# Altium PCB FullSheetOLD.PcbDoc (part 8 of 8)
Units mm, origin at the board's own origin, x right, y up, seen from the top; angles counter-clockwise.
Board outline 132.46 x 194.44 mm, 4 copper layers (Top Copper, L2_GND, L3_PWR_SIG, Bottom Copper), stack 1.586 mm thick; 495 components, 210 nets, 2171 pads, 1027 vias.
Unrouted connection lines stored in the file: 53.
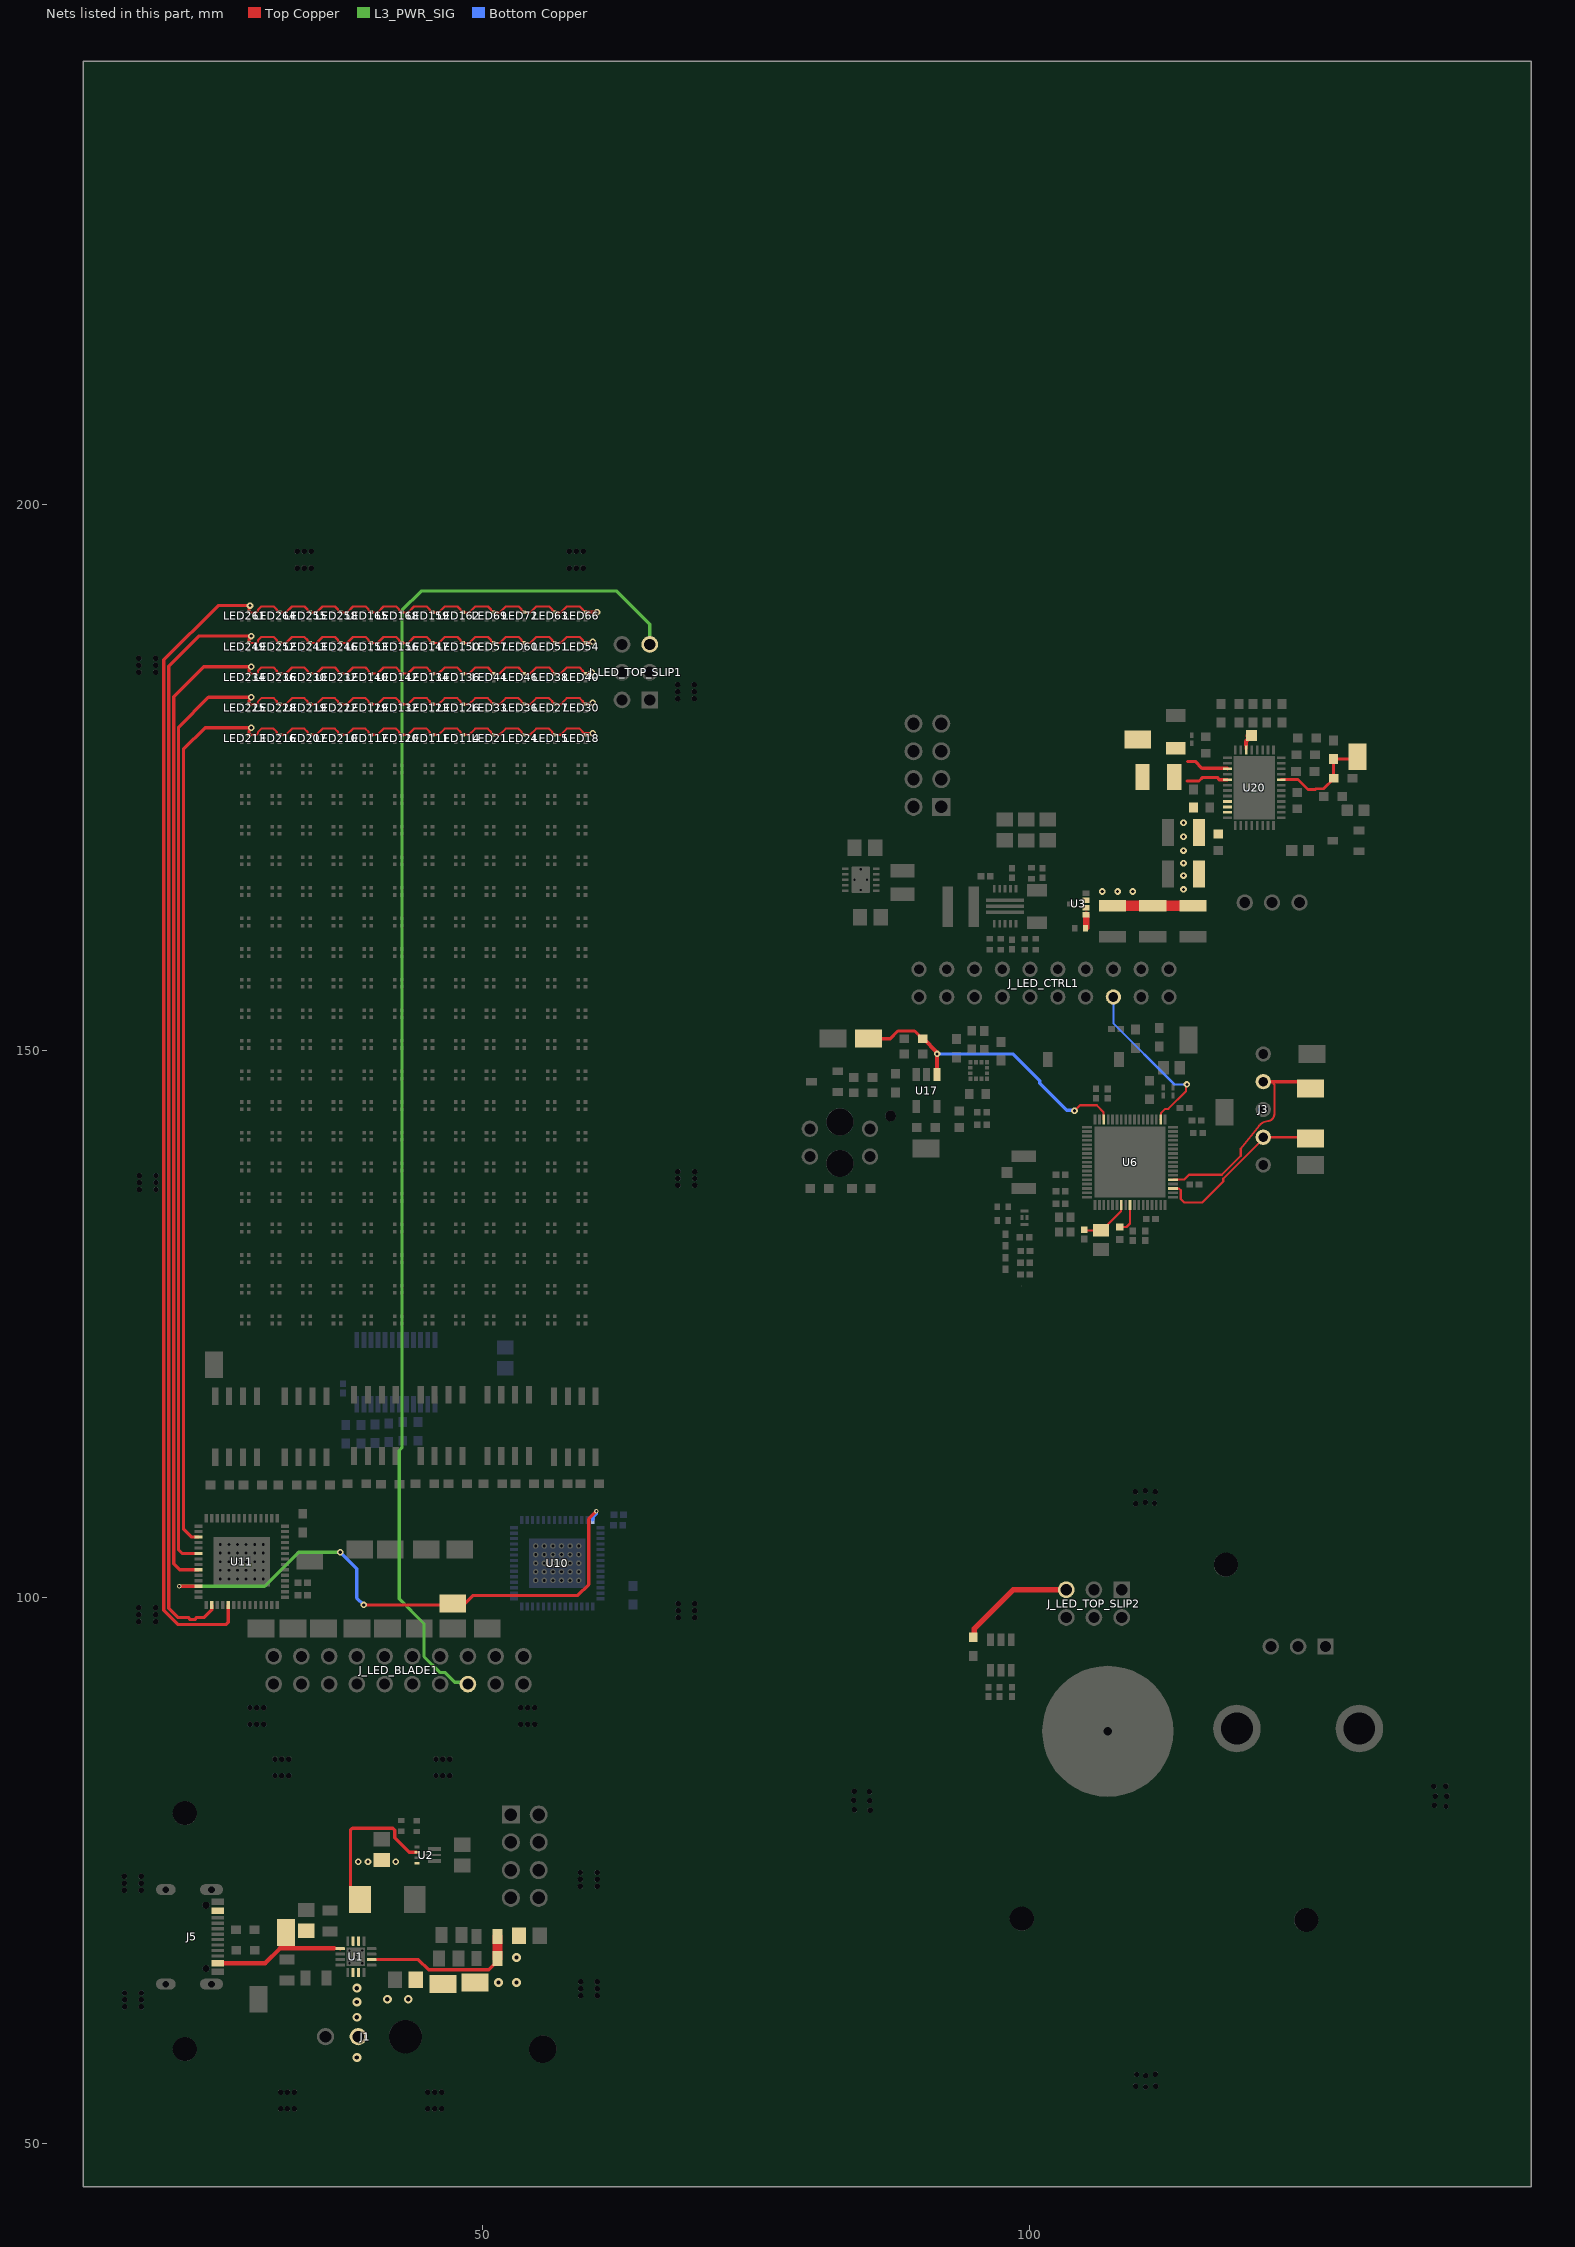
[diagram p9: the nets of this part, all layers, seen from the top]

## Via types
v1: diameter 0.6, hole 0.3, Top Copper to Bottom Copper, 857 vias
v2: diameter 0.8, hole 0.4, Top Copper to Bottom Copper, 91 vias
v3: diameter 0.4, hole 0.2, Top Copper to Bottom Copper, 79 vias

## Nets (pads, with @x,y where several pads share a name; then routed paths per layer and width w, separated by ;. In a path a pad name is that pad's centre, name@x,y a point inside that pad or via, vN(x,y) a via of type N, cw(c..) or ccw(c..) an arc to the next point about the centre after c; other vN are vias at no path point) (continued)
R19: LED15.3 LED18.3 LED21.3 LED24.3 LED111.3 LED114.3 LED117.3 LED120.3 LED207.3 LED210.3 LED213.3 LED216.3 U11.17 | length 118
  Top Copper w0.2: LED213.3@28.6,178.93 29.305,178.93 29.422,179.047 29.422,179.171 29.744,179.493 30.861,179.493 31.155,179.199 31.155,179.112 31.272,178.995 31.335,178.995 LED216.3@31.4,178.93 31.975,178.93 32.538,179.493 33.661,179.493 33.955,179.199 33.955,179.112 34.072,178.995 34.135,178.995 LED207.3@34.2,178.93 34.769,178.93 35.332,179.493 36.461,179.493 36.755,179.199 36.755,179.112 36.872,178.995 36.935,178.995 LED210.3@37,178.93 37.563,178.93 38.126,179.493 39.261,179.493 39.555,179.199 39.555,179.112 39.672,178.995 39.735,178.995 LED117.3@39.8,178.93 40.357,178.93 40.92,179.493 42.061,179.493 42.355,179.199 42.355,179.112 42.472,178.995 42.535,178.995 LED120.3@42.6,178.93 43.151,178.93 43.714,179.493 44.861,179.493 45.155,179.199 45.155,179.112 45.272,178.995 45.335,178.995 LED111.3@45.4,178.93 45.945,178.93 46.508,179.493 47.661,179.493 47.955,179.199 47.955,179.112 48.072,178.995 48.135,178.995 LED114.3@48.2,178.93 48.739,178.93 49.302,179.493 50.461,179.493 50.755,179.199 50.755,179.112 50.872,178.995 50.935,178.995 LED21.3@51,178.93 51.533,178.93 52.096,179.493 53.261,179.493 53.555,179.199 53.555,179.112 53.672,178.995 53.735,178.995 LED24.3@53.8,178.93 54.327,178.93 54.89,179.493 56.061,179.493 56.355,179.199 56.355,179.112 56.472,178.995 56.535,178.995 LED15.3@56.6,178.93 57.121,178.93 57.684,179.493 58.861,179.493 59.155,179.199 59.155,179.112 59.272,178.995 LED18.3@59.335,178.995
  Top Copper w0.3: U11.17@23.992,105.527 23.362,105.527 22.614,106.275 22.614,177.601 24.591,179.578 v1(28.829,179.578) 28.829,179.497 28.615,179.283 28.615,178.945 LED213.3@28.6,178.93 ; LED18.3@59.335,178.995 59.352,179.013 60.014,179.013 v1(60.071,179.07)
R20: LED27.3 LED30.3 LED33.3 LED36.3 LED123.3 LED126.3 LED129.3 LED132.3 LED219.3 LED222.3 LED225.3 LED228.3 U11.20 | length 122.9
  Top Copper w0.2: LED225.3@28.6,181.73 29.305,181.73 29.422,181.847 29.422,181.965 29.744,182.287 30.867,182.287 31.155,181.999 31.155,181.912 31.272,181.795 31.335,181.795 LED228.3@31.4,181.73 31.981,181.73 32.538,182.287 33.667,182.287 33.955,181.999 33.955,181.912 34.072,181.795 34.135,181.795 LED219.3@34.2,181.73 34.775,181.73 35.332,182.287 36.467,182.287 36.755,181.999 36.755,181.912 36.872,181.795 36.935,181.795 LED222.3@37,181.73 37.569,181.73 38.126,182.287 39.267,182.287 39.555,181.999 39.555,181.912 39.672,181.795 39.735,181.795 LED129.3@39.8,181.73 40.363,181.73 40.92,182.287 42.067,182.287 42.355,181.999 42.355,181.912 42.472,181.795 42.535,181.795 LED132.3@42.6,181.73 43.157,181.73 43.714,182.287 44.867,182.287 45.155,181.999 45.155,181.912 45.272,181.795 45.335,181.795 LED123.3@45.4,181.73 45.951,181.73 46.508,182.287 47.667,182.287 47.955,181.999 47.955,181.912 48.072,181.795 48.135,181.795 LED126.3@48.2,181.73 48.745,181.73 49.302,182.287 50.467,182.287 50.755,181.999 50.755,181.912 50.872,181.795 50.935,181.795 LED33.3@51,181.73 51.539,181.73 52.096,182.287 53.267,182.287 53.555,181.999 53.555,181.912 53.672,181.795 53.735,181.795 LED36.3@53.8,181.73 54.333,181.73 54.89,182.287 56.067,182.287 56.355,181.999 56.355,181.912 56.472,181.795 56.535,181.795 LED27.3@56.6,181.73 57.127,181.73 57.684,182.287 58.867,182.287 59.155,181.999 59.155,181.912 59.272,181.795 LED30.3@59.335,181.795
  Top Copper w0.3: U11.20@23.992,104.027 22.481,104.027 22.164,104.343 22.164,179.633 24.903,182.372 v1(28.829,182.372) 28.829,182.291 28.615,182.077 28.615,181.745 LED225.3@28.6,181.73 ; LED30.3@59.4,181.73 59.415,181.745 59.871,181.745 59.99,181.864 v1(60.071,181.864)
R21: LED38.3 LED40.3 LED44.3 LED46.3 LED134.3 LED136.3 LED140.3 LED142.3 LED230.3 LED232.3 LED234.3 LED236.3 U11.23 | length 127.9
  Top Copper w0.2: LED234.3@28.6,184.53 29.305,184.53 29.422,184.647 29.422,184.759 29.744,185.081 30.873,185.081 31.155,184.799 31.155,184.712 31.272,184.595 31.335,184.595 LED236.3@31.4,184.53 31.987,184.53 32.538,185.081 33.673,185.081 33.955,184.799 33.955,184.712 34.072,184.595 34.135,184.595 LED230.3@34.2,184.53 34.781,184.53 35.332,185.081 36.473,185.081 36.755,184.799 36.755,184.712 36.872,184.595 36.935,184.595 LED232.3@37,184.53 37.575,184.53 38.126,185.081 39.273,185.081 39.555,184.799 39.555,184.712 39.672,184.595 39.735,184.595 LED140.3@39.8,184.53 40.369,184.53 40.92,185.081 42.073,185.081 42.355,184.799 42.355,184.712 42.472,184.595 42.535,184.595 LED142.3@42.6,184.53 43.163,184.53 43.714,185.081 44.873,185.081 45.155,184.799 45.155,184.712 45.272,184.595 45.335,184.595 LED134.3@45.4,184.53 45.957,184.53 46.508,185.081 47.673,185.081 47.955,184.799 47.955,184.712 48.072,184.595 48.135,184.595 LED136.3@48.2,184.53 48.751,184.53 49.302,185.081 50.473,185.081 50.755,184.799 50.755,184.712 50.872,184.595 50.935,184.595 LED44.3@51,184.53 51.545,184.53 52.096,185.081 53.273,185.081 53.555,184.799 53.555,184.712 53.672,184.595 53.735,184.595 LED46.3@53.8,184.53 54.339,184.53 54.89,185.081 56.073,185.081 56.355,184.799 56.355,184.712 56.472,184.595 56.535,184.595 LED38.3@56.6,184.53 57.133,184.53 57.684,185.081 58.873,185.081 59.155,184.799 59.155,184.712 59.272,184.595 59.335,184.595 LED40.3@59.4,184.53
  Top Copper w0.3: U11.23@23.985,102.526 23.677,102.526 23.67,102.533 22.255,102.533 21.714,103.074 21.714,182.427 24.453,185.166 v1(28.829,185.166) 28.829,185.085 28.615,184.871 28.615,184.545 LED234.3@28.6,184.53 ; LED40.3@59.4,184.53 59.415,184.545 59.809,184.545 59.907,184.643 v1(59.988,184.643)
R22: LED51.3 LED54.3 LED57.3 LED60.3 LED147.3 LED150.3 LED153.3 LED156.3 LED243.3 LED246.3 LED249.3 LED252.3 U11.30 | length 137.8
  Top Copper w0.2: LED249.3@28.6,187.33 29.305,187.33 29.422,187.447 29.422,187.553 29.744,187.875 30.879,187.875 31.155,187.599 31.155,187.512 31.272,187.395 31.335,187.395 LED252.3@31.4,187.33 31.993,187.33 32.538,187.875 33.679,187.875 33.955,187.599 33.955,187.512 34.072,187.395 34.135,187.395 LED243.3@34.2,187.33 34.787,187.33 35.332,187.875 36.479,187.875 36.755,187.599 36.755,187.512 36.872,187.395 36.935,187.395 LED246.3@37,187.33 37.581,187.33 38.126,187.875 39.279,187.875 39.555,187.599 39.555,187.512 39.672,187.395 39.735,187.395 LED153.3@39.8,187.33 40.375,187.33 40.92,187.875 42.079,187.875 42.355,187.599 42.355,187.512 42.472,187.395 42.535,187.395 LED156.3@42.6,187.33 43.169,187.33 43.714,187.875 44.879,187.875 45.155,187.599 45.155,187.512 45.272,187.395 45.335,187.395 LED147.3@45.4,187.33 45.963,187.33 46.508,187.875 47.679,187.875 47.955,187.599 47.955,187.512 48.072,187.395 48.135,187.395 LED150.3@48.2,187.33 48.757,187.33 49.302,187.875 50.479,187.875 50.755,187.599 50.755,187.512 50.872,187.395 50.935,187.395 LED57.3@51,187.33 51.551,187.33 52.096,187.875 53.279,187.875 53.555,187.599 53.555,187.512 53.672,187.395 53.735,187.395 LED60.3@53.8,187.33 54.345,187.33 54.89,187.875 56.079,187.875 56.355,187.599 56.355,187.512 56.472,187.395 56.535,187.395 LED51.3@56.6,187.33 57.009,187.33 57.035,187.356 57.165,187.356 57.684,187.875 58.879,187.875 59.155,187.599 59.155,187.512 59.272,187.395 LED54.3@59.335,187.395
  Top Copper w0.3: U11.30@25.203,99.316 25.203,98.877 25.153,98.827 25.153,98.814 24.509,98.171 23.838,98.171 23.647,97.98 23.233,97.98 23.042,98.171 22.098,98.171 21.264,99.005 21.264,185.221 24.003,187.96 v1(28.829,187.96) 28.829,187.879 28.615,187.665 28.615,187.345 LED249.3@28.6,187.33 ; LED54.3@59.4,187.33 59.415,187.345 59.883,187.345 59.99,187.452 v1(60.071,187.452)
R23: LED63.3 LED66.3 LED69.3 LED72.3 LED159.3 LED162.3 LED165.3 LED168.3 LED255.3 LED258.3 LED261.3 LED264.3 U11.33 | length 143
  Top Copper w0.2: LED261.3@28.6,190.13 29.305,190.13 29.422,190.247 29.422,190.347 29.744,190.669 30.885,190.669 31.155,190.399 31.155,190.312 31.272,190.195 31.335,190.195 LED264.3@31.4,190.13 31.999,190.13 32.538,190.669 33.685,190.669 33.955,190.399 33.955,190.312 34.072,190.195 34.135,190.195 LED255.3@34.2,190.13 34.793,190.13 35.332,190.669 36.485,190.669 36.755,190.399 36.755,190.312 36.872,190.195 36.935,190.195 LED258.3@37,190.13 37.587,190.13 38.126,190.669 39.285,190.669 39.555,190.399 39.555,190.312 39.672,190.195 39.735,190.195 LED165.3@39.8,190.13 40.381,190.13 40.92,190.669 42.085,190.669 42.355,190.399 42.355,190.312 42.472,190.195 42.535,190.195 LED168.3@42.6,190.13 43.175,190.13 43.714,190.669 44.885,190.669 45.155,190.399 45.155,190.312 45.272,190.195 45.335,190.195 LED159.3@45.4,190.13 45.969,190.13 46.508,190.669 47.685,190.669 47.955,190.399 47.955,190.312 48.072,190.195 48.135,190.195 LED162.3@48.2,190.13 48.763,190.13 49.302,190.669 50.485,190.669 50.755,190.399 50.755,190.312 50.872,190.195 50.935,190.195 LED69.3@51,190.13 51.557,190.13 52.096,190.669 53.285,190.669 53.555,190.399 53.555,190.312 53.672,190.195 53.735,190.195 LED72.3@53.8,190.13 54.351,190.13 54.89,190.669 56.085,190.669 56.355,190.399 56.355,190.312 56.472,190.195 56.535,190.195 LED63.3@56.6,190.13 57.145,190.13 57.684,190.669 58.885,190.669 59.155,190.399 59.155,190.375 LED66.3@59.4,190.13
  Top Copper w0.3: U11.33@26.703,99.316 26.703,97.712 26.527,97.536 23.84,97.536 23.834,97.53 23.047,97.53 23.041,97.536 22.097,97.536 20.814,98.819 20.814,185.787 25.781,190.754 v1(28.702,190.754) 28.702,190.673 28.615,190.586 28.615,190.145 LED261.3@28.6,190.13 ; v1(60.452,190.132) v1(60.452,190.132) LED66.3@59.401,190.131 ; LED66.3@59.4,190.13 LED66.3@59.401,190.131
ROT_INDEX: R43.2 TP26.1 U6.15 U17.1 | length 28
  Top Copper w0.2: v1(104.14,144.526) 104.648,145.034 106.17,145.034 106.797,144.407 106.797,143.774 U6.15@106.82,143.751
  Top Copper w0.3: TP26.1@85.293,151.123 87.276,151.123 87.984,151.83 89.508,151.83 90.208,151.13 R43.2@90.258,151.13
  Top Copper w0.381: R43.2@90.308,151.13 91.562,149.876 U17.1@91.562,147.857
  Bottom Copper w0.3: v1(91.567,149.733) 98.494,149.733 100.96,147.267 100.96,147.042 103.419,144.583 104.083,144.583 v1(104.14,144.526)
SOUT: TP17.1 U10.42 U11.26 | length 52.8
  Top Copper w0.3: v3(22.234,101.033) 22.241,101.026 U11.26@23.992,101.026 ; v1(39.116,99.314) 48.26,99.314 49.131,100.185 58.69,100.185 59.689,101.184 59.689,107.187 v3(60.392,107.89)
  L3_PWR_SIG w0.3: v3(22.234,101.033) 30.037,101.033 33.143,104.14 v1(36.957,104.14)
  Bottom Copper w0.3: v1(36.957,104.14) 38.481,102.616 38.481,99.949 v1(39.116,99.314) ; U10.42@60.057,107.097 60.057,107.324 60.373,107.64 60.373,107.871 v3(60.392,107.89)
SOX: TP_SOX.1 U20.38 | length 1.4
  Top Copper w0.3: U20.38@119.825,177.646 119.825,177.99
  Top Copper w0.4: 119.825,177.99 119.825,178.341 119.967,178.483 TP_SOX.1@120.109,178.625
  Top Copper w0.5: TP_SOX.1@120.03,178.858 TP_SOX.1@120.315,178.858
SW_BK: L8.1 U20.5 | length 3.9
  Top Copper w0.3: 114.426,174.702 115.528,174.702 115.853,175.027 117.192,175.027 117.391,174.828 U20.5@118.145,174.828
SWAKE: R55.2 R56.2 TP_SWK.1 U20.28 | length 9.6
  Top Copper w0.254: U20.28@123.052,174.828 124.598,174.828 125.088,174.338 125.505,173.921 126.174,173.921 126.243,173.99 126.912,173.99 R56.2@127.865,174.942 127.825,174.982 R55.2@127.825,176.72 129.476,176.72 TP_SWK.1@129.857,177.101
SWCLK: J3.4 TP10.1 U6.56 | length 20
  Top Copper w0.2: U6.56@113.144,138.227 113.167,138.25 114.189,138.25 114.611,138.672 117.606,138.672 119.347,140.414 119.347,141.064 121.049,143.174 cw(c121.916,142.475) 121.834,143.586 ccw(c121.759,144.25) 122.428,144.25 122.428,146.939 122.174,147.193
  Top Copper w0.3: J3.4@121.412,147.193 122.174,147.193 124.695,147.193 125.33,146.558 TP10.1@125.73,146.558
SWDIO: J3.2 TP8.1 U6.54 | length 16.3
  Top Copper w0.2: U6.54@113.144,137.427 113.167,137.404 113.705,137.404 113.851,137.258 113.851,136.466 114.173,136.144 115.84,136.144 117.751,138.055 117.751,138.322 121.412,141.983 J3.2@121.412,142.113 125.603,142.113 TP8.1@125.73,141.986
TOP_UI.TOUCH_OUT_TOP: J_LED_BLADE1.15 J_LED_CTRL1.15 J_LED_TOP_SLIP1.05 J_LED_TOP_SLIP2.05 R53.1 U6.2 | length 155.6
  Top Copper w0.2: U6.2@112.02,143.751 112.043,143.774 112.043,144.312 112.434,144.703 112.717,144.703 114.353,146.339 114.353,146.865 v1(114.427,146.939)
  Top Copper w0.5: R53.1@94.869,96.404 94.987,96.522 94.987,97.146 98.552,100.711 J_LED_TOP_SLIP2.05@103.378,100.711
  L3_PWR_SIG w0.3: J_LED_BLADE1.15@48.641,92.075 48.467,92.249 47.429,92.249 46.541,93.137 46.077,93.137 44.623,94.591 44.623,97.595 42.353,99.865 42.353,113.447 42.607,113.701 42.607,190.308 44.381,192.082 62.254,192.082 65.278,189.058 65.278,187.706 65.786,187.198 65.577,186.989 J_LED_TOP_SLIP1.05@65.577,186.694
  Bottom Copper w0.2: J_LED_CTRL1.15@107.696,154.94 107.696,152.527 113.284,146.939 v1(114.427,146.939)
VBAT: C2.2 J1.1 TP_VBT.1 U1.2 U1.3
  other v2: 38.481,57.912 38.481,61.595 38.481,62.992 41.275,63.246 43.18,63.246 38.481,64.262
VBK: C_bk1.2 L8.2 TP_VBK.1 U20.3 | length 3.9
  Top Copper w0.3: 114.49,176.495 115.184,176.495 115.802,175.877 117.544,175.877 117.564,175.856 118.117,175.856 U20.3@118.145,175.828
VBUS: C1.2 J5.A4_B9 J5.B4_A9 TP_VBS.1 U1.13 | length 11.8
  Top Copper w0.3: 36.405,67.889 36.936,67.889 U1.13@36.956,67.869
  Top Copper w0.4: J5.B4_A9@25.756,66.549 30.1,66.549 31.44,67.889 36.405,67.889
VFBSMPS: C34.2 L5.1 U6.41 | length 4.7
  Top Copper w0.2: C34.2@105.029,133.652 105.092,133.589 106.695,133.589 107.177,134.07 107.177,134.122 108.397,135.342 108.397,135.88 U6.41@108.42,135.903
VLXSMPS: L4.2 U6.43 | length 2.8
  Top Copper w0.2: L4.2@108.27,133.901 108.903,133.901 109.22,134.218 U6.43@109.22,135.903
VMOTOR_ROT: C13.2 C14.2 C15.2 C52.2 C53.2 C54.1 C_VM_BK1.1 R10.2 U3.1 U3.2 U3.3 U20.9 U20.10 U20.11 | length 8.6
  Top Copper w0.6: R10.2@105.194,161.273 U3.1@105.194,162.474
  Top Copper w1: C13.2@107.624,163.289 111.307,163.289 C15.2@114.99,163.289
  other v1: 106.68,164.592 108.077,164.592 109.474,164.592 114.109,164.782 114.109,166.052 114.109,167.195 114.109,168.338 114.109,169.608 114.109,170.879
VSYS: C3.2 C4.2 L1.1 R1.2 R2.2 TP_VSYS.1 U1.6 U1.10 U1.11 U2.5 U2.7 | length 27.1
  Top Copper w0.3: 37.896,73.66 37.896,78.717 38.071,78.892 41.76,78.892 41.935,78.717 41.935,78.012 43.269,76.679 U2.5@43.983,76.679 ; U1.6@39.826,66.869 44.109,66.869 45.049,65.929 50.538,65.929 51.333,66.724 R2.2@51.333,66.954
  Top Copper w0.9: R2.2@51.333,66.954 R1.2@51.333,68.986
  Top Copper w1: C3.2@53.266,69.025 C3.2@53.304,69.063
  other v1: 38.608,75.819 39.497,75.819 42.037,75.819
  other v2: 51.435,64.77 53.086,64.77 53.086,67.056
pads on no net: B1.14 B1.15 B1.16 B1.17 E1. J1.3 J5. J5.A6 J5.A7 J5.A8 J5.B6 J5.B7 J5.B8 J_LED_CTRL1.20 U1.14 U1.15 U6.17 U6.18 U6.19 U6.23 U6.27 U6.36 U6.37 U6.38 U6.40 U6.46 U6.47 U6.48 U6.49 U6.51 U6.52 U6.53 U6.57 U6.61 U6.62 U6.63 U6.64 U11.2 U11.3 U11.4 U11.5 U11.6 U11.7 U11.36 U11.37 U11.38 U11.39 U11.40 U11.41 U11.44 U11.45 U11.46 U11.47 U11.48 U11.49 U11.50 U11.51 U11.52 U11.53 U11.54 U11.55 U16. U18.5 U18.11 U20.22 U20.23 U20.24 U20.25 U20.32 U20.33 U20.36 U20.37 U20.39 X3.1 X3.2
copper on no net:
  other v1: 26.47,124.936 28.702,143.256 28.705,146.068 28.705,148.862 28.705,151.656 28.705,154.45 28.956,157.226 28.956,160.02 28.956,162.814 28.956,165.608

## Polygon pours and split planes (outlines as drawn)
DVDD on Top Copper "DVDD_L01_P102" (solid, pour order 102): 116.776,177.609 117.704,176.682 118.554,176.682 118.554,176.975 116.649,178.879 116.649,180.277 116.522,180.403 116.142,180.403 115.51,179.772 115.51,177.99 116.395,177.99
GND_ROT on Top Copper "GND_ROT_L01_P118" (solid, pour order 118): 123.932,182.987 128.163,182.987 129.222,181.927 129.222,179.895 128.905,179.578 127.635,179.578 127.317,179.895 127.317,180.403 126.809,180.911 125.666,180.911 125.158,180.403 125.158,179.895 124.777,179.514 124.016,179.514 123.761,179.769 123.75,182.805
+3V3_ROT on Top Copper "+3V3_ROT_L01_P057" (solid, pour order 57): 85.672,164.796 86.361,164.796 86.361,164.657 86.868,164.15 86.868,163.388 86.881,163.388 87.376,162.892 87.376,160.594 86.868,160.086 86.106,160.086 85.631,160.561 85.631,160.753
+3V3_ROT on Top Copper "+3V3_ROT_L01_P056" (solid, pour order 56): 83.578,164.849 82.742,164.849 82.224,164.331 82.224,162.88 82.93,162.88 83.573,163.52
PGND on Top Copper "PGND_L01_P110" (solid, pour order 110): 117.753,171.471 117.762,171.481 118.554,171.481 118.554,166.811 118.303,166.566 116.56,166.606 116.37,166.797 116.37,168.552 116.875,169.058 117.762,169.058
NetQ2_1 on Top Copper "NETQ2_1_L01_P109" (solid, pour order 109): 118.808,180.53 118.22,179.942 118.22,178.96 118.624,178.556 118.866,178.556 119.253,178.943 119.253,179.451 119.316,179.514 120.968,179.514 120.968,180.53
MOTOR_FAULT on Top Copper "MOTOR_FAULT_L01_P103" (solid, pour order 103): 117.03,180.53 118.046,180.53 118.046,178.879 119.005,177.921 119.005,177.14 118.723,177.14 118.702,177.119 117.03,178.791 117.03,179.641
+3V3_ROT on Top Copper "+3V3_ROT_L01_P116" (solid, pour order 116): 125.793,180.276 126.809,180.276 126.936,180.149 126.936,175.07 125.73,175.07 125.73,180.213
5V_ROT on Top Copper "5V_ROT_L01_P144" (solid, pour order 144): 90.17,161.162 88.9,159.892 88.9,154.178 90.678,154.178 90.678,157.353 93.031,159.706 93.031,161.145
GND_ROT on Top Copper "GND_ROT_L01_P083" (solid, pour order 83): 96.698,170.412 102.743,170.412 102.743,167.513 105.642,167.513 105.642,171.069 96.207,180.504 ccw(c94.151,178.448) 94.151,181.356 88.646,181.356 87.884,180.594 87.884,177.038 88.773,176.149 93.378,176.149 cw(c93.378,175.002) 94.189,175.813 96.161,173.841 cw(c94.864,172.544) 96.698,172.544
GND_ROT on Top Copper "GND_ROT_L01_P122" (solid, pour order 122): 128.969,175.451 128.969,174.308 130.238,174.308 131,173.418 131,172.529 129.603,172.529 129.603,169.355 132.524,169.355 132.524,174.561 131.636,175.451
DRVOFF on Top Copper "DRVOFF_L01_P106" (solid, pour order 106): 122.618,171.641 122.618,171.12 122.622,171.117 124.793,171.117 127.063,168.846 128.333,168.846 128.333,170.116 126.809,171.641
MOTOR_U on Top Copper "MOTOR_U_L01_P142" (solid, pour order 142): 118.722,171.01 118.618,170.906 118.618,162.941 119.38,162.179 120.142,162.179 120.523,162.56 120.523,164.973 119.253,166.243 119.38,166.37 119.38,169.926 119.507,170.053 119.504,170.056 119.504,171.018
5V_BASE on Top Copper "5V_BASE_L01_P000" (solid, pour order 0): 44.831,76.683 50.8,76.683 50.8,80.239 43.18,80.239 43.18,79.324 44.831,79.324
GND_BASE on Top Copper "GND_BASE_L01_P004" (solid, pour order 4): 44.958,76.154 44.958,70.333 50.8,70.333 50.8,76.154
GND_BASE on Top Copper "GND_BASE_L01_P007" (solid, pour order 7): 40.665,79.299 42.926,79.299 42.926,81.305 40.665,81.305
GND_BASE on Top Copper "GND_BASE_L01_P016" (solid, pour order 16): 50.8,76.048 56.769,76.048 56.769,70.333 50.8,70.333
5V_BASE on Top Copper "5V_BASE_L01_P017" (solid, pour order 17): 50.8,76.683 56.769,76.683 56.769,81.712 51.181,81.712 51.181,80.62 50.8,80.239
VSYS on Top Copper "VSYS_L01_P030" (solid, pour order 30): 50.899,63.881 48.26,63.881 47.969,63.881 47.969,64.172 47.969,65.838 50.594,65.838 50.594,69.85 53.938,69.85 53.938,68.006 53.938,64.225 53.594,63.881
GND_BASE on Top Copper "GND_BASE_L01_P038" (solid, pour order 38): 39.23,67.729 39.215,67.691 44.704,67.691 44.831,67.818 44.831,68.707 44.704,68.834 40.259,68.834 39.23,67.959
GND_BASE on Top Copper "GND_BASE_L01_P040" (solid, pour order 40): 38.72,66.3 38.971,66.049 38.971,65.287 40.371,64.186 42.723,64.186 42.866,64.329 42.866,66.354 42.702,66.518 39.143,66.518
VBAT on Top Copper "VBAT_L01_P043" (solid, pour order 43): 40.259,62.357 40.513,62.611 44.323,62.611 44.577,62.865 45.131,63.945 47.587,63.945 47.587,65.592 45.131,65.592 44.577,65.786 43.18,65.786 43.18,64.008 42.951,63.779 40.259,63.779
GND_BASE on Top Copper "GND_BASE_L01_P044" (solid, pour order 44): 56.769,70.333 55.88,69.444 55.88,68.326 54.483,68.326 54.483,70.104 54.11,70.333 54.61,70.358
NetL3_2 on Top Copper "NETL3_2_L01_P051" (solid, pour order 51): 86.393,166.351 85.598,166.351 85.598,165.983 86.431,165.983 86.741,165.674 89.535,165.674 89.789,165.928 89.789,167.071 89.535,167.325 87.15,167.325
NetL3_1 on Top Copper "NETL3_1_L01_P053" (solid, pour order 53): 86.868,165.375 85.467,165.375 85.476,164.929 86.339,164.929 86.937,164.438 87.173,163.261 89.535,163.261 89.662,163.388 89.662,165.293 89.58,165.375
5V_ROT on Top Copper "5V_ROT_L01_P054" (solid, pour order 54): 86.36,166.563 85.598,166.563 85.598,167.198 84.914,167.881 84.914,170.627 86.995,170.627 86.995,167.706 86.36,167.071
GND_ROT on Top Copper "GND_ROT_L01_P055" (solid, pour order 55): 83.757,161.102 83.757,167.309 83.453,167.309 83.185,167.577 83.185,169.484 83.423,169.722 84.471,169.722 84.85,169.343 84.85,167.817 85.485,167.182 85.485,161.496 85.09,161.102
VMOTOR_ROT on Top Copper "VMOTOR_ROT_L01_P059" (solid, pour order 59): 106.425,163.82 106.281,163.998 104.808,163.998 104.808,162.173 105.425,162.185 106,162.761 106.425,162.761
NetC6_2 on Top Copper "NETC6_2_L01_P060" (solid, pour order 60): 95.123,166.116 95.123,165.227 95.021,165.125 94.333,165.125 94.333,161.29 95.391,161.29 95.73,161.629 95.73,162.941 99.667,162.941 99.667,163.534 96.111,163.534 95.73,163.915 95.73,165.205 95.976,165.465 95.976,166.307 95.314,166.307
GND_ROT on Top Copper "GND_ROT_L01_P062" (solid, pour order 62): 96.012,162.859 101.259,162.859 101.617,162.501 101.617,161.104 99.799,161.104 99.799,162.287 99.561,162.525 96.457,162.501 96.482,160.673 96.012,160.673 96.012,159.639 98.679,159.639 99.06,159.258 99.06,159.004 100.067,159.004 100.055,159.499 100.289,159.74 100.862,159.741 101.161,159.444 101.161,159.2 100.588,158.627 94.611,158.627 94.361,158.877 94.361,160.274 94.996,160.909 95.863,160.909 96.012,161.264 96.012,162.501
GND_ROT on Top Copper "p" (solid, pour order 68): 102.57,170.415 102.57,173.082 102.189,173.463 97.236,173.463 96.728,172.955 96.728,170.415
5V_ROT on Top Copper "5V_ROT_L01_P070" (solid, pour order 70): 97.118,165.215 97.124,165.221 97.928,165.221 97.928,164.435 97.952,164.411 97.946,164.405 97.112,164.405
NetC6_1 on Top Copper "NETC6_1_L01_P072" (solid, pour order 72): 96.653,164.481 96.931,164.481 96.931,166.086 96.744,166.273 96.125,166.273 96.125,165.682 96.2,165.608 96.529,165.608 96.644,165.493
no net on Top Copper "NONET_L01_P076" (solid, pour order 76): 96.139,163.957 96.139,163.562 96.111,163.534
NetC7_2 on Top Copper "NETC7_2_L01_P077" (solid, pour order 77): 98.679,163.957 98.679,163.61 99.667,163.61 99.667,163.802 99.822,163.957 101.854,163.957 102.997,162.814 104.394,162.814 104.394,164.846 103.886,165.354 102.489,165.354 101.6,166.243 99.822,166.243 99.695,166.116 99.695,164.338
GND_ROT on Top Copper "GND_ROT_L01_P078" (solid, pour order 78): 108.463,159.939 108.839,159.939 108.839,160.988 107.432,160.988 107.099,160.655 104.526,160.655 104.203,160.333 104.203,159.068 104.521,158.75 107.533,158.75
5V_ROT on Top Copper "5V_ROT_L01_P081" (solid, pour order 81): 102.489,170.053 96.012,170.053 95.631,169.672 95.631,168.656 95.885,168.402 102.489,168.402
5V_ROT on Top Copper "5V_ROT_L01_P082" (solid, pour order 82): 90.55,165.481 93.012,165.481 93.012,160.758 93.021,160.75 90.585,160.75 90.188,161.144 90.166,165.094
NetC49_2 on Top Copper "NETC49_2_L01_P091" (solid, pour order 91): 101.571,95.844 111.065,95.845 cw(c111.065,92.021) 113.769,94.724 115.314,93.18 cw(c113.163,91.029) 116.205,91.028 116.205,82.804 ccw(c118.598,82.804) 118.598,80.411 131.336,80.411 cw(c131.703,77.845) 134.052,76.749 cw(c102.302,85.66) 129.522,67.044 cw(c111.919,83.963) 87.582,85.934 cw(c88.21,85.821) 88.338,86.446 89.655,87.764 ccw(c90.792,87.583) 90.611,86.446 95.717,86.447 ccw(c95.718,90.043) 99.314,90.043 99.314,91.567 98.495,91.562 98.495,93.842 99.224,94.732 cw(c101.57,92.813)
GND_TOP on Top Copper "GND_TOP_L01_P095" (solid, pour order 95): 95.758,91.313 95.758,89.535 96.139,89.154 98.171,89.154 98.933,89.916 98.933,91.313
VMOTOR_ROT on Top Copper "VMOTOR_ROT_L01_P097" (solid, pour order 97): 117.759,173.017 118.619,173.017 118.619,171.626 117.575,171.626 117.575,170.461 117.919,170.117 117.919,169.227 116.776,169.227 116.268,168.719 116.268,164.782 116.268,162.767 106.045,162.767 106.045,164.719 106.426,165.1 109.982,165.1 110.617,163.957 113.284,163.957 113.51,164.183 113.51,171.295 113.728,171.513 114.648,172.911 115.567,172.911 115.567,172.088 116.141,171.513 117.157,171.513 117.157,172.423
MOTOR_U on Top Copper "MOTOR_U_L01_P098" (solid, pour order 98): 127.397,169.561 128.191,169.561 128.191,168.035 128.041,167.885 128.041,165.583 129.159,164.465 129.159,161.163 128.778,160.782 127.762,160.782 127.397,161.147
MOTOR_W on Top Copper "MOTOR_W_L01_P100" (solid, pour order 100): 121.73,171.005 121.73,169.355 121.856,169.227 121.856,166.56 123.507,164.909 123.507,162.75 124.015,162.243 125.412,162.243 125.793,162.624 125.793,164.665 122.618,167.108 122.618,171.005
PGND on Top Copper "PGND_L01_P101" (solid, pour order 101): 111.061,171.513 113.347,171.513 113.347,164.274 110.934,164.274 110.807,164.401 110.807,171.259
DRVOFF on Top Copper "DRVOFF_L01_P107" (solid, pour order 107): 128.079,173.927 128.079,172.656 130.238,172.656 130.493,172.91 130.493,173.546 130.112,173.927
NetC54_2 on Top Copper "NETC54_2_L01_P113" (solid, pour order 113): 118.56,173.458 118.56,173.146 118.545,173.131 117.702,173.131 116.94,172.713 116.948,172.705 116.948,171.777 116.111,171.777 116.111,172.784 117.157,173.418
VBK on Top Copper "VBK_L01_P115" (solid, pour order 115): 114.49,176.132 113.902,176.72 111.419,176.72 111.419,173.903 111.252,173.736 109.624,173.736 108.394,177.609 108.394,179.387 113.902,179.387 115.386,176.72 115.386,176.132
PGND on Top Copper "PGND_L01_P119" (solid, pour order 119): 122.745,170.37 122.745,167.322 123.38,166.688 124.523,166.688 124.523,169.735 123.888,170.37
GND_ROT on Top Copper "GND_ROT_L01_P121" (solid, pour order 121): 124.65,170.37 124.65,166.179 127.317,166.179 127.317,168.593 127.191,168.593 125.412,170.37
SW_BK on Top Copper "SW_BK_L01_P133" (solid, pour order 133): 112.459,176.339 112.459,173.799 114.109,173.799 114.236,173.927 114.554,174.498 114.554,174.879 113.855,176.339
no net on Top Copper "NONET_L01_P138" (solid, pour order 138): 95.377,147.701 94.869,148.209 94.488,148.209 94.361,148.082
5V_ROT on Top Copper "5V_ROT_L01_P141" (solid, pour order 141): 84.914,174.703 84.914,170.627 86.995,170.627 86.995,167.706 87.188,167.513 90.17,167.513 90.17,161.162 90.574,160.758 93.012,160.758 93.012,165.481 93.218,165.687 93.218,175.26 92.71,175.768 85.979,175.768
MOTOR_V on Top Copper "MOTOR_V_L01_P099" (solid, pour order 99): 120.181,171.023 120.185,171.02 121.015,171.02 121.015,169.324 121.019,169.32 120.87,169.17 120.87,167.166 123.126,164.909 123.126,162.496 122.872,162.243 121.348,162.243 120.713,162.877 120.713,166.052 120.332,166.434 120.332,169.17 120.204,169.356
VBUS on Top Copper "VBUS_L01_P037" (solid, pour order 37): 37.465,67.691 37.465,68.004 36.535,68.707 35.052,68.707 34.671,69.088 34.671,70.231 33.02,70.231 31.623,71.628 25.146,71.628 25.146,71.309 25.146,71.247 25.146,71.189 25.146,70.993 26.67,70.993 27.051,70.612 29.972,70.612 31.369,69.215 31.369,67.691 35.687,67.691
GND_BASE on Top Copper "GND_BASE_L01_P039" (solid, pour order 39): 24.13,73.66 24.13,72.86 25.146,72.545 25.146,71.823 31.877,71.755 33.147,70.612 36.83,70.612 37.084,70.866 37.084,73.533 36.957,73.66
GND_BASE on Top Copper "GND_BASE_L01_P036" (solid, pour order 36): 31.587,57.884 27.376,64.008 23.749,64.008 23.749,65.255 25.146,65.255 25.146,66.04 34.29,66.04 34.544,65.786 34.544,64.643 35.179,64.008 36.322,64.008 36.449,63.881 36.449,57.912 35.814,57.277 32.741,57.277 32.004,57.277
+3V3_ROT on L3_PWR_SIG "+3V3_ROT_L03_P146" (solid, pour order 146): 88.9,183.515 78.867,172.974 78.867,139.192 81.534,136.525 89.408,136.525 97.028,128.905 118.237,128.905 128.524,139.192 128.524,160.655 133.858,165.989 133.858,177.673 128.016,183.515
VMOTOR_ROT on L3_PWR_SIG "VMOTOR_ROT_L03_P137" (solid, pour order 137): 113.538,171.577 114.681,171.577 114.935,171.323 114.935,164.465 114.427,163.957 106.299,163.957 106.045,164.211 106.045,164.846 106.553,165.354 112.522,165.354 113.411,166.243 113.411,171.323
GND_LED on L3_PWR_SIG "GND_LED_L03_P139" (solid, pour order 139): 54.229,105.41 54.229,100.838 55.499,100.838 55.753,100.584 55.753,99.695 56.515,99.695 57.658,100.838 59.436,100.838 59.436,105.41
VSYS on L3_PWR_SIG "VSYS_L03_P049" (solid, pour order 49): 54.053,64.177 53.984,69.337 53.335,69.977 48.895,69.977 42.799,76.073 42.672,76.073 42.164,76.581 38.227,76.581 37.719,76.073 37.719,70.866 39.751,68.834 43.555,68.834 48.006,64.383 48.006,63.881 53.721,63.881
VBAT on L3_PWR_SIG "VBAT_L03_P048" (solid, pour order 48): 44.45,63.754 44.45,62.738 44.323,62.611 40.513,62.611 40.259,62.357 40.259,57.912 39.624,57.277 37.719,57.277 37.084,57.912 37.084,64.291 37.586,64.987 38.785,64.987 39.906,64.136 44.069,64.135
5V_BASE on L3_PWR_SIG "5V_BASE_L03_P050" (solid, pour order 50): 51.308,81.661 49.911,80.264 45.212,80.264 44.831,79.883 44.831,77.089 45.212,76.708 56.388,76.708 56.769,77.089 56.769,81.28 56.388,81.661
GND_TOP on L2_GND "GND_TOP_L02_P096" (solid, pour order 96): 97.574,102.362 110.363,102.362 112.903,99.133 124.641,99.133 126.365,97.409 126.354,97.398 126.354,90.921 124.085,88.652 96.006,88.652 93.726,90.932 93.726,99.133
GND_BASE on L2_GND "GND_BASE_L02_P047" (solid, pour order 47): 25.146,64.008 25.146,72.517 23.95,72.884 23.95,73.66 25.318,73.66 32.398,73.66 ccw(c32.398,74.534) 33.12,74.041 33.45,74.524 37.109,80.662 cw(c38.644,79.747) 38.644,81.534 43.71,81.534 cw(c43.71,80.054) 44.757,81.1 49.134,76.723 ccw(c50.091,77.68) 50.091,76.327 56.261,76.327 cw(c56.261,75.692) 56.896,75.692 56.896,70.866 cw(c56.261,70.866) 56.261,70.231 45.847,70.231 45.085,69.469 45.085,63.881 37.973,63.881 36.83,62.738 36.83,57.15 33.374,57.15 cw(c33.374,59.741) 31.232,58.282 28.194,62.738 27.347,64.008
PGND on Bottom Copper "PGND_L04_P131" (solid, pour order 131): 110.299,171.132 110.299,164.782 111.061,164.02 114.998,164.02 116.395,165.417 116.395,166.433 116.522,166.56 123.253,166.56 124.015,167.322 124.015,170.117 123.762,170.37 117.767,170.37 114.998,171.894 111.061,171.894
GND_ROT on Bottom Copper "GND_ROT_L04_P124" (solid, pour order 124): 124.267,170.374 124.267,166.307 124.521,166.053 127.052,166.053 128.966,169.609 131.887,169.609 132.398,170.119 132.398,174.305 130.998,175.704 130.236,175.704 128.966,176.975 128.966,181.8 128.458,182.309 124.145,182.309 123.624,181.796 123.443,171.198

## Keep-outs
Top Copper:
  circle w5: c117.983,102.997 r1
  circle w5: c99.314,70.612 r1
  circle w5: c125.349,70.485 r1

## Other copper
Top Copper:
  region net VSYS: 37.932,76.505 37.744,76.272 37.744,73.584 37.744,69.698 38.003,69.439 38.003,68.139 38.786,68.139 38.793,68.132 38.811,68.15 38.811,69.774 41.601,71.374 41.601,75.311 43.979,75.311 44.221,75.554 44.221,75.819 42.834,75.819 42.054,76.505
  region net GND_BASE: 39.013,66.279 39.007,66.285 38.854,66.285 39.014,66.124
  region net GND_BASE: 39.218,66.497 39.218,66.498 39.412,66.498 39.22,66.689
  region net GND_BASE: 38.71,67.957 38.71,66.319 38.735,66.294 39.345,66.294 39.395,66.243 40.259,66.243 40.259,66.497 39.218,66.497 39.218,67.716 39.243,67.742 40.259,67.742 40.259,67.996 39.421,67.996 39.382,67.957
  region net GND_BASE: 41.529,77.241 39.98,77.241 39.446,76.708 38.379,76.708 38.379,78.537 41.529,78.537
  region net VBAT: 38.015,66.116 38.775,66.116 38.776,66.117 38.776,64.922 39.345,64.516 40.259,63.779 40.259,57.912 39.624,57.277 37.719,57.277 37.109,57.887 37.109,59.284 37.109,63.932 37.389,64.211 37.998,64.821
  region net NetR3_2: 37.777,66.109 37.777,65.277 37.78,65.273 36.971,64.464 35.23,64.464 35.23,65.93 37.507,65.93 37.523,65.945 37.523,66.109
  region net Fdbk: 44.247,77.038 44.247,78.842 42.24,78.842 42.24,78.334 43.536,77.038
  region net NetL1_2: 46.228,76.556 44.45,76.556 44.45,75.159 42.672,74.016 42.672,70.333 44.831,70.333 44.831,73.508 44.831,76.302 46.228,76.302
  region net NetANT1_1: 93.059,126.695 92.659,126.695 92.659,125.095 101.559,125.095 101.559,124.295 93.059,124.295 92.659,124.295 92.659,122.695 99.259,122.695 99.259,123.095 93.059,123.095 93.059,123.895 101.959,123.895 101.959,125.495 101.559,125.495 93.059,125.495 93.059,126.295 101.959,126.295 101.959,127.895 101.559,127.895 99.459,127.895 99.459,128.995 99.059,128.995 99.059,127.495 101.559,127.495 101.559,126.695

## Silkscreen, mask and mechanical layers (free items; w line width, h text height)
Top Overlay:
  text "VBUS" at 27.124,74.114 h1.5
  text "VBAT" at 48.383,61.972 h1.5
  text "GND" at 23.364,61.845 h1.5
  text "VSYS" at 48.383,60.067 h1.5
Mechanical 1:
  lines w0.254: 19.176,58.166 22.176,55.166 55.547,55.166 58.547,58.166 58.547,80.312 55.547,83.312 22.176,83.312 19.176,80.312 19.176,58.166 ; 20.495,93.297 23.495,90.297 64.485,90.297 67.485,93.297 67.485,190.802 64.485,193.802 23.495,193.802 20.495,190.802 20.495,93.297
Layout_Grouping:
  text "MTR" at 129.921,181.229 h1
  text "3.3V REG" at 91.567,177.927 h1
  text "12V REG" at 90.17,168.91 h1
Drill Drawing:
  lines w0.254: 37.907,69.535 44.389,69.535 44.389,69.784 37.907,69.784 37.907,69.535

## Text inside footprints (layer, text, board x,y; h text height)
J5: Mechanical 13 "PCB EDGE" at 18.501,63.549 h0.41 r270
J_BASE_LOWER: Top Overlay "RefDes" at 53.213,78.232 h1.27 r270; Top Overlay "REFDES" at 53.213,78.549 h1.27 r270; Mechanical 13 "RefDes2" at 53.213,78.549 h1.27 r270
J_ROT_LOWER: Top Overlay "RefDes" at 91.313,174.244 h1.27 r90; Top Overlay "REFDES" at 91.313,173.927 h1.27 r90; Mechanical 13 "RefDes2" at 91.313,173.927 h1.27 r90
L8: Mechanical 13 "RefDes2" at 114.046,175.704 h1.27 r180
U6: Top Overlay "*" at 111.985,145.161 h1.27 r270; Mechanical 13 "*" at 111.985,143.612 h1.27 r270
U7: Top Overlay "*" at 100.203,133.045 h1.27 r90; Mechanical 13 "*" at 100.203,134.595 h1.27 r90
U8: Top Overlay "*" at 25.095,112.255 h1.27 r90; Mechanical 13 "*" at 26.302,113.704 h1.27 r90
U9: Top Overlay "*" at 43.891,112.382 h1.27 r90; Mechanical 13 "*" at 45.098,113.831 h1.27 r90
U10: Mechanical 13 "*" at 55.107,104.637 h1.27 r270; Bottom Overlay "*" at 60.053,97.846 h1.27 r270
U11: Top Overlay "*" at 31.199,108.567 h1.27 r270; Mechanical 13 "*" at 26.253,101.776 h1.27 r270
U12: Top Overlay "*" at 31.445,112.255 h1.27 r90; Mechanical 13 "*" at 32.652,113.704 h1.27 r90
U13: Top Overlay "*" at 49.987,112.382 h1.27 r90; Mechanical 13 "*" at 51.194,113.831 h1.27 r90
U14: Top Overlay "*" at 37.795,112.381 h1.27 r90; Mechanical 13 "*" at 39.002,113.83 h1.27 r90
U15: Top Overlay "*" at 56.083,112.255 h1.27 r90; Mechanical 13 "*" at 57.29,113.704 h1.27 r90
U19: Mechanical 13 "1" at 95.504,92.837 h0.81